# Altium PCB DB36.PcbDoc (part 2 of 6)
Units mm, origin at the board's own origin, x right, y up, seen from the top; angles counter-clockwise.
Board outline 82.2 x 113.2 mm, 8 copper layers (Top Layer, MidLayer1, MidLayer2, GND, MidLayer3, VCC, MidLayer4, Bottom Layer), stack 1.57 mm thick; 185 components, 477 nets, 1727 pads, 1538 vias.
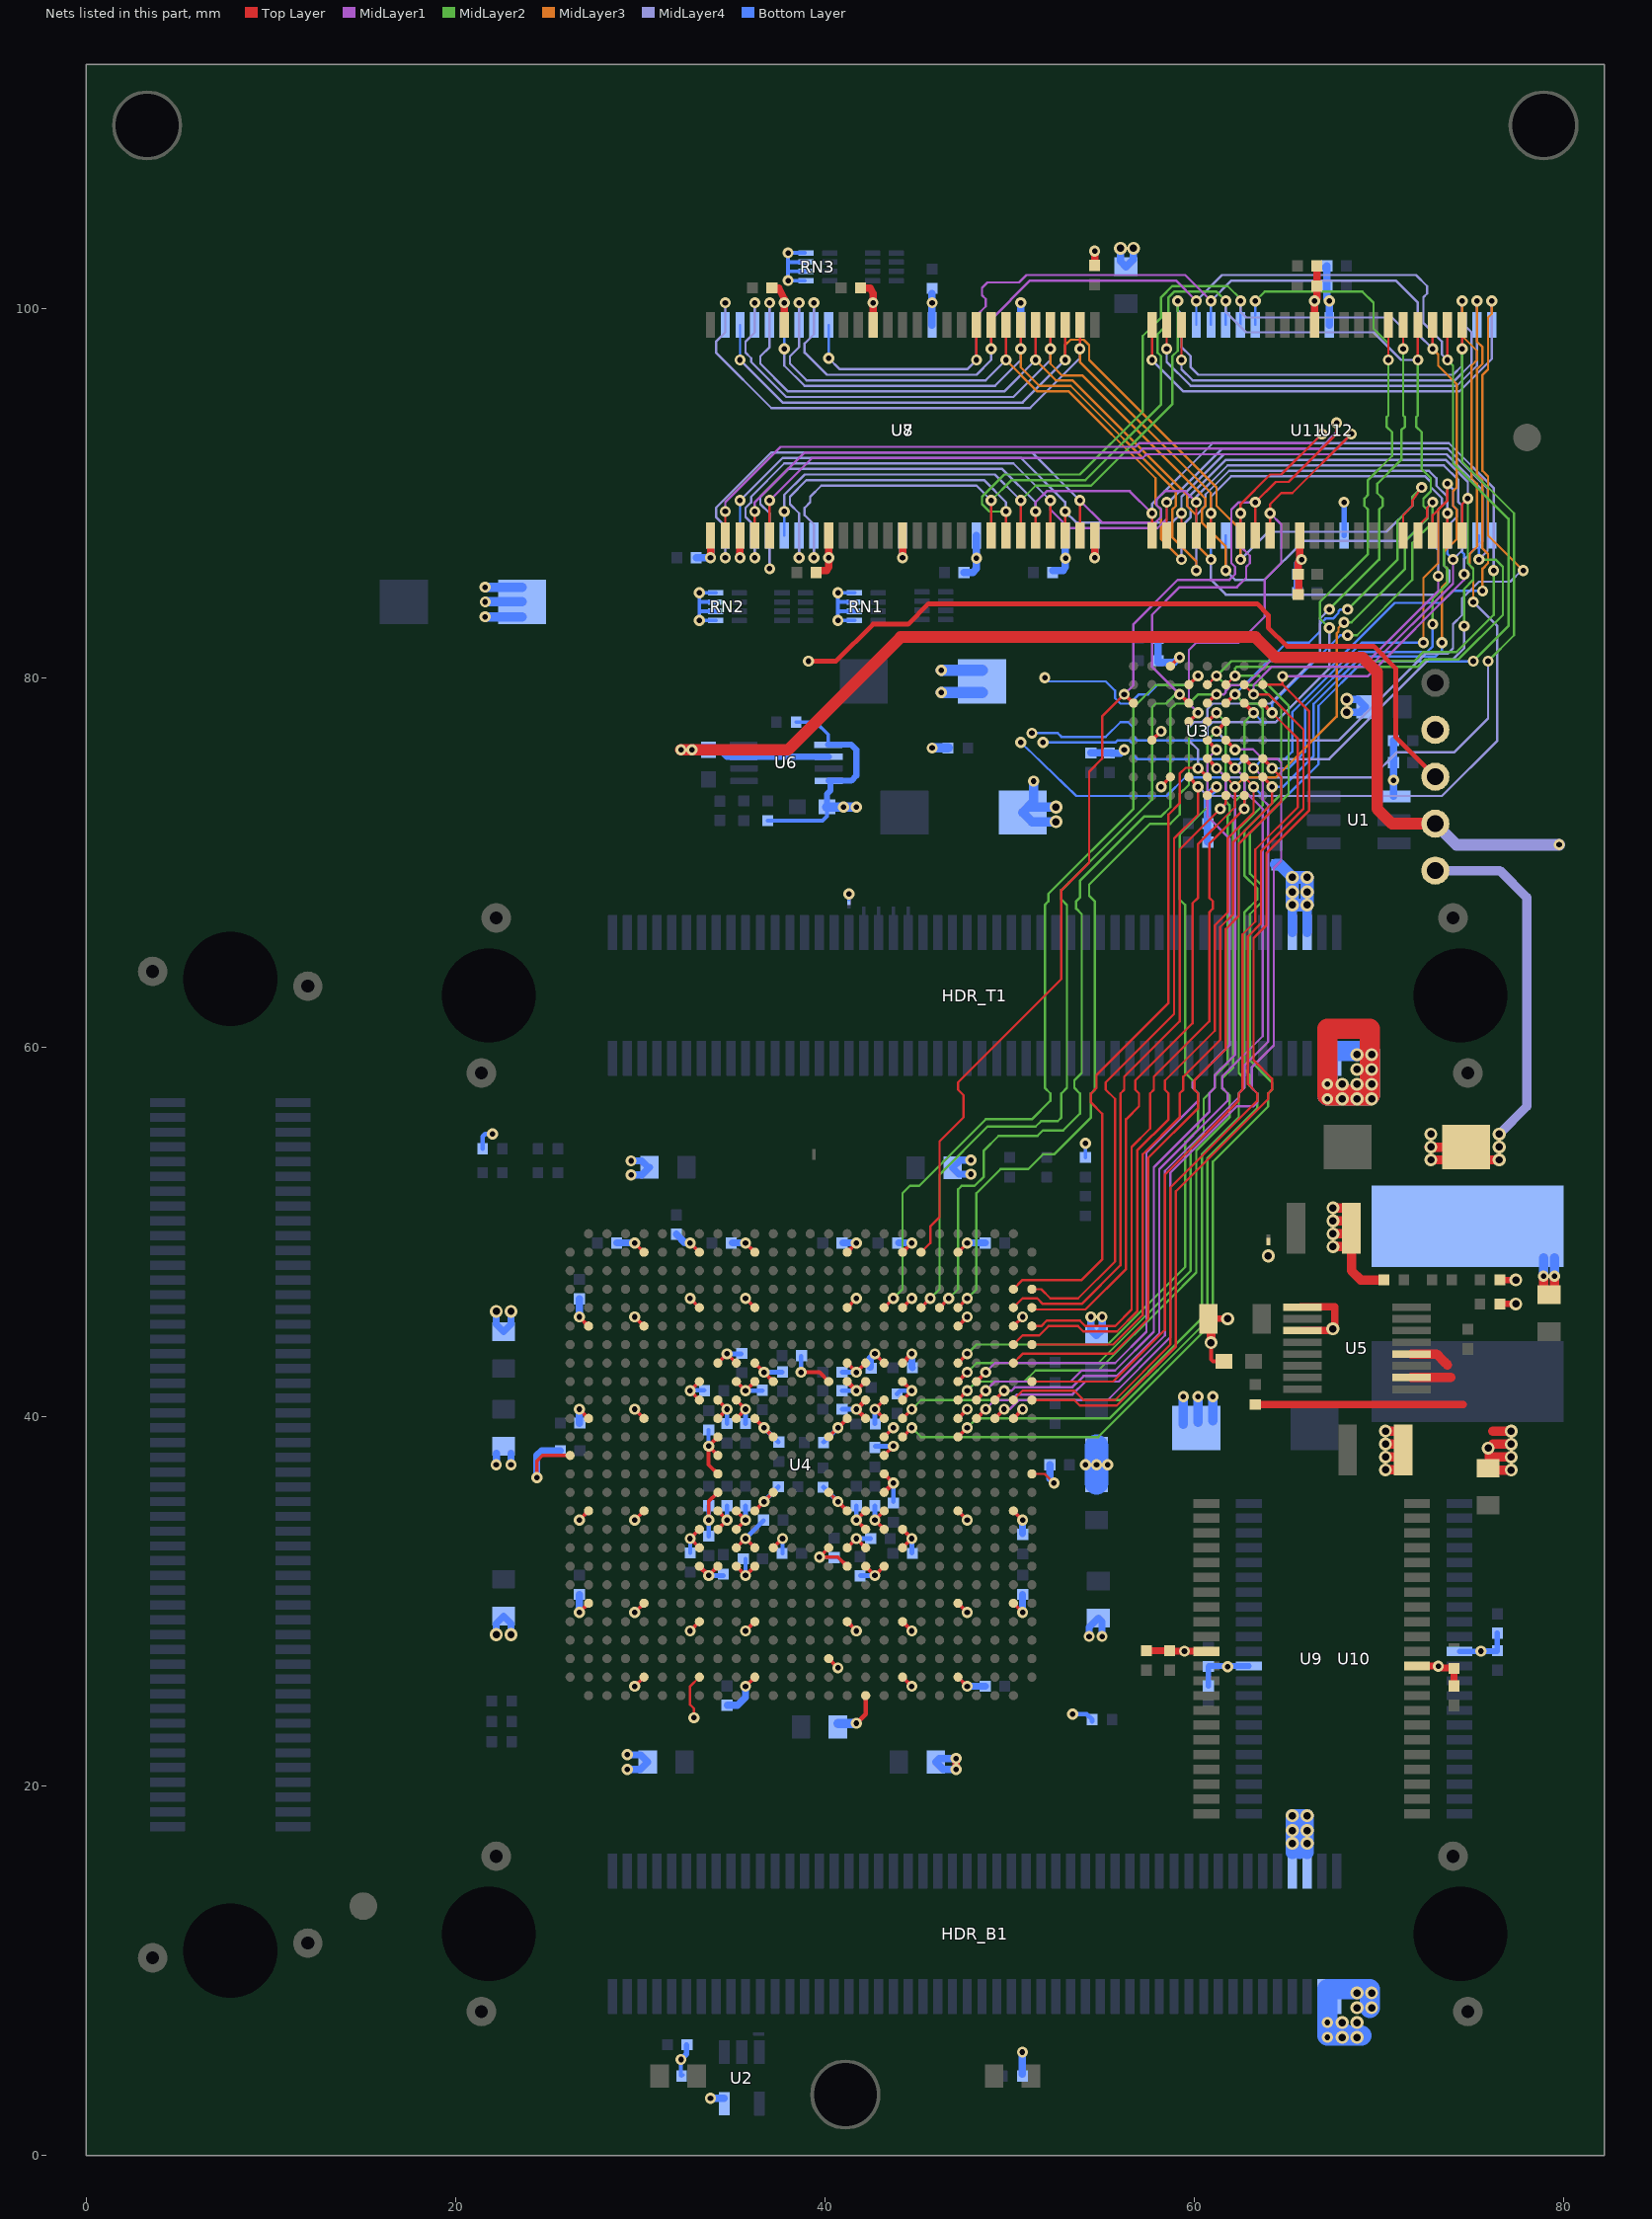
[diagram p8: the nets of this part, all layers, seen from the top]

## Part data
"Altium Logo Bot1" "Altium Logo Top1": library part D-000-0003, "Altium Logo for PCB"
C1 C7 C8 C9 C10 C11 C12 C13 C14 C25 C26 C27 C40 C41 C42 C43 C44 C71 C72 C73 C77 C91 C92 C93 C94 C99 C100 C103 C104 C107 C108 C109 C110: library part D-101-0080, "Capacitor, Ceramic, 0.1uF 10% 16V 0402 (1005) X7R"
C2 C15 C16 C17 C18 C19 C20 C21 C22 C28 C29 C30 C31 C45 C46 C47 C48 C49 C50 C51 C52 C53 C54 C55 C56 C57 C58 C59 C60 C61 C62 C63 C64 C65 C66 C67 C68 C74 C75 C76 C95 C96 C97 C98 C101 C102 C105 C106 C111 C112 C113 C114: library part D-101-0077, "Capacitor, Ceramic, 10nF 10% 16V 0402 (1005) X7R"
C3 C23 C69 C70 C82: library part D-101-0088, "Capacitor, Tantalum, 220uF 10% 10V MCCT-D (7343-31)"
C4 C5 C6 C24 C32 C33 C34 C35 C36 C37 C38 C39 C78 C79 C83 C85: library part D-101-0087, "Capacitor, Ceramic, 10uF 10% 10V 0805 (2012) X5R"
C80: library part D-101-0069, "Capacitor, Ceramic, 470pF 5% 50V 0402 (1005) COG"
C81 C88 C89: library part D-101-0095, "Capacitor, Ceramic, 2.2uF 10% 10V 0603 (1608) X5R"
C84 C86: library part D-101-0021, "Capacitor, Ceramic, 22uF -20%/+80% 10V 1210 (3225) Y5V"
C87: library part D-101-0027, "Capacitor, Ceramic, 1uF 10% 25V 1206 (3216) X7R"
C90: library part D-101-0105, "Capacitor, Ceramic, 0.033uF 10% 10V 0402 (1005) X7R"
FD1 FD2: library part D-000-0005, "Fiducial - Round 1.5mm Top-Bottom"
HDR_B1 HDR_L1 HDR_T1: library part D-300-0025, "Connector, Molex Docking Station 100 Pin Male 54075"
L1: library part D-102-0004, "Inductor, 2.2uH, 15A, 4R2, SMD"
LED1: library part D-153-0004, "LED, Green 0805 (2012) KP-2012SGD"
LED2: library part D-153-0003, "LED, Red 0805 (2013) HSMH-C170"
MH1 MH2 MH3: library part D-001-0001, "Mounting Hole, M3 Screw, Plated, Square Pad"
NT1 NT2 NT3 NT4 NT5 NT6 NT7 NT8: library part D-002-0002, "Net-Tie, Surface Mount, 2 x 0.4mm x 0.2mm SMT Pads - For 0.2mm Track"
PCB1: library part D-810-0010, "DB36 Blank PCB - Daughter Board Xilinx Virtex4 XC4VLX25FF668"
R1 R2: library part D-100-0111, "Resistor, 270R 1% 0402 (1005)"
R3 R5 R9 R12: library part D-100-0088, "Resistor, 4K7 1% 0402 (1005)"
R4 R6 R7 R8 R10 R11 R13 R14 R15 R16 R17: library part D-100-0131, "Resistor, 100R 1% 0402 (1005)"
R22 R27 R28 R29: library part D-100-0132, "Resistor, 100K 1% 0402 (1005)"
R23: library part D-100-0128, "Resistor, 10R 1% 0402 (1005)"
R24 R26: library part D-100-0105, "Resistor, 2K7 1% 0402 (1005)"
R25: library part D-100-0109, "Resistor, 27K 1% 0402 (1005)"
RN1 RN2 RN3 RN4 RN5 RN6: library part D-104-0001, "Resistor Network, Isolated, 4 x 100R, 5%, SMD 0402 x 4"
TP1 TP2 TP3 TP4 TP5: library part D-006-0000, "Test Point, PCB Mount with Silkscreen Box"
U1: library part D-263-0002, "Dual Addressable Switch Plus 1KB Memory"
U2: library part D-205-0001, "SN74LVC1G04DBV, Single Inverter Gate, 1.65-V to 5.5-V"
U3: library part D-262-0001, "S29GL256N11FFIV10, 256 Megabit (16M x 16) 3.0V Page Mode Flash Memory"
U4: library part D-241-0007, "FPGA, Xilinx Virtex-4, XC4VLX25"
U5: library part D-204-0002, "MAX1831EEE, 3A, 1MHz, Low-Voltage, Step-Down Regulators with Synchronous Rectification and Internal Switches"
U6: library part D-204-0016, "MAX8860EUA18+, 1.8V Linear Regulator with adjustable Output, Low-noise, Low-dropout, 300mA, uMAX"
U7 U8: library part D-261-0000, "MT48LC16M16A2TG, 256 Mbit High-Speed CMOS SDRAM, 16Mb x 16Bit x 4 Banks, TSOP54"
U9 U10 U11 U12: library part D-260-0000, "K6R4016V1D-TC10T, 256K x 16-Bit SRAM, TSOP44"

## Via types
v1: diameter 0.6, hole 0.3, Top Layer to Bottom Layer, 904 vias
v2: diameter 0.6, hole 0.3, Top Layer to Bottom Layer, tented both sides, 506 vias
v3: diameter 0.7, hole 0.4, Top Layer to Bottom Layer, 127 vias
v4: diameter 0.6, hole 0.3, Top Layer to Bottom Layer, tented top, 1 vias

## Nets (pads, with @x,y where several pads share a name; then routed paths per layer and width w, separated by ;. In a path a pad name is that pad's centre, name@x,y a point inside that pad or via, vN(x,y) a via of type N, cw(c..) or ccw(c..) an arc to the next point about the centre after c; other vN are vias at no path point)
1V2: C3.1 C4.1 C5.1 C6.1 C7.1 C8.1 C9.1 C10.1 C11.1 C12.1 C13.1 C14.1 C15.1 C16.1 C17.1 C18.1 C19.1 C20.1 C21.1 C22.1 C82.1 C85.1 C86.1 L1.2 R24.1 TP5.1 U4.J10 U4.J11 U4.J16 U4.J17 U4.K9 U4.K10 U4.K17 U4.K18 U4.L9 U4.L10 U4.L11 U4.L16 U4.L17 U4.L18 U4.M12 U4.M15 U4.R12 U4.R15 U4.T9 U4.T10 U4.T11 U4.T16 U4.T17 U4.T18 U4.U9 U4.U10 U4.U17 U4.U18 U4.V10 U4.V11 U4.V16 U4.V17 | length 82.6
  Top Layer w0.2: U4.U9@34.2,33.9 v1(34.7,34.4) U4.T9@34.2,34.9 ; U4.L9@34.2,39.9 v1(34.7,40.4) U4.K9@34.2,40.9 ; U4.V10@35.2,32.9 v1(35.7,33.4) U4.V11@36.2,32.9 ; U4.U10@35.2,33.9 v1(35.7,34.4) U4.T10@35.2,34.9 ; U4.L10@35.2,39.9 v1(35.7,40.4) U4.K10@35.2,40.9 ; U4.J10@35.2,41.9 v1(35.7,41.4) U4.J11@36.2,41.9 ; U4.T11@36.2,34.9 v1(36.7,35.4) U4.R12@37.2,35.9 ; U4.L11@36.2,39.9 U4.M12@37.2,38.9 ; U4.R15@40.2,35.9 v1(40.7,35.4) U4.T16@41.2,34.9 ; U4.M15@40.2,38.9 U4.L16@41.2,39.9 ; U4.V16@41.2,32.9 v1(41.7,33.4) U4.V17@42.2,32.9 ; v1(41.7,41.4) U4.J17@42.2,41.9 ; U4.U17@42.2,33.9 v1(41.7,34.4) U4.T17@42.2,34.9 ; U4.U18@43.2,33.9 v1(42.7,34.4) U4.T18@43.2,34.9 ; U4.L18@43.2,39.9 v1(42.7,40.4) U4.K18@43.2,40.9
  Top Layer w0.254: U4.J16@41.2,41.9 v1(41.7,41.4) ; U4.L17@42.2,39.9 v1(41.7,40.4) U4.K17@42.2,40.9
  Top Layer w0.5: C86.1@68.4,50.2 C86.1@68.45,50.15 ; C86.1@68.5,49.5 68.5,50.2 68.5,47.9 69,47.4 R24.1@70.262,47.4 ; v3(72.8,53.9) C82.1@74,53.9 ; C82.1@74.709,53.9 v3(76.5,53.9) ; C82.1@74.709,54.6 C82.1@74.702,54.593 C82.1@75.395,53.9 ; C85.1@78.9,46.6 v1(78.9,47.6) ; C85.1@79.5,46.6 v1(79.5,47.6)
  Top Layer w0.508: v3(67.5,49.2) C86.1@68.5,49.2 ; v3(67.5,49.9) C86.1@68.5,49.9 ; v3(67.5,50.6) C86.1@68.5,50.6 ; v3(67.5,51.3) C86.1@68.5,51.3 ; v3@72.707,54.593 C82.1@74.702,54.593
  MidLayer4 w0.508: TP5.1@73.043,69.562 76.538,69.562 78,68.1 78,56.8 v3(76.5,55.3)
  Bottom Layer w0.2: v1(36.7,35.4) v1@36.7,35.425 ; v1@40.6,35.4 v1(40.7,35.4)
  Bottom Layer w0.254: v1(34.7,34.4) C19.1@34.7,35.175 ; C22.1@34.7,39.625 v1(34.7,40.4) ; v1(35.7,33.4) C11.1@36.675,34.375 ; v1(35.7,34.4) C20.1@35.7,35.175 ; C14.1@35.7,39.625 v1(35.7,40.4) ; v1(35.7,41.4) C18.1@36.6,41.4 ; v1@36.7,35.425 C9.1@37.475,36.2 ; v1(36.7,39.4) C13.1@37.475,38.625 ; C15.1@39.925,36.175 v1(40.7,35.4) ; C10.1@39.925,38.625 v1(40.7,39.4) ; C21.1@40.925,40.4 v1(41.7,40.4) ; C12.1@40.925,41.4 v1(41.7,41.4) ; v1(41.7,33.4) C7.1@42.475,33.4 ; v1(41.7,34.4) C8.1@41.7,35.175 ; v1(42.7,34.4) C16.1@42.7,35.175 ; C17.1@42.7,39.625 v1(42.7,40.4)
  Bottom Layer w0.4: v1(22.2,37.4) C4.1@22.2,38 ; v1(23,37.4) C4.1@23,38
  Bottom Layer w0.5: v1(78.9,47.6) L1.2@78.9,48.6 ; v1(79.5,47.6) L1.2@79.5,48.6
  Bottom Layer w0.508: C3.1@59.4,39.586 v1(59.4,41.086) ; C3.1@60.2,39.686 v1(60.2,41.086) ; C3.1@61,39.786 v1(61,41.086)
  Bottom Layer w1.27: C6.1@54.7,38.4 54.701,38.399 C5.1@54.701,36.4
  other v1: 54.1,37.4 54.701,37.4 55.3,37.4
  other v3: 72.8,54.6 76.5,54.6 72.8,55.3
2V5: C23.1 C24.1 C25.1 C26.1 C27.1 C28.1 C29.1 C30.1 C31.1 C88.1 R22.2 R28.1 TP3.1 U4.AF17 U4.H11 U4.H16 U4.H17 U4.J12 U4.M9 U4.N9 U4.N18 U4.P9 U4.P18 U4.R18 U4.V15 U4.W10 U4.W11 U4.W16 U6.1 U6.4 | length 81.1
  Top Layer w0.2: 33.7,37.4 U4.P9@34.2,36.9 ; v1(33.7,38.4) U4.N9@34.2,37.9 ; U4.H11@36.2,42.9 v1(36.7,42.4) U4.J12@37.2,41.9 ; U4.H16@41.2,42.9 v1(41.7,42.4) U4.H17@42.2,42.9 ; U4.N18@43.2,37.9 v1(43.7,38.4)
  Top Layer w0.203: 33.7,37.4 v1(33.7,38.4) U4.M9@34.2,38.9 ; U4.W10@35.2,31.9 v1(35.7,31.4) U4.W11@36.2,31.9 ; U4.V15@40.2,32.9 v1(39.7,32.4) 40.7,32.4 U4.W16@41.2,31.9 ; U4.P18@43.2,36.9 v1(43.7,36.4)
  Top Layer w0.254: v2(39.1,80.9) 40.6,80.9 42.6,82.9 44.5,82.9 45.6,84 63.4,84 64,83.4 64,82.7 65,81.7 69.7,81.7 70.9,80.5 70.9,77.331 70.9,76.785 TP3.1@73.043,74.642 ; v1(41.7,23.4) 42.2,23.9 U4.AF17@42.2,24.9 ; U4.R18@43.2,35.9 v1(43.7,36.4)
  Bottom Layer w0.2: v1(43.7,38.4) v1@43.7,38.6
  Bottom Layer w0.203: v1(33.7,38.4) C29.1@33.7,39.275 ; v1(35.7,31.4) C31.1@35.7,32.3 ; R22.2@36.9,72.262 39.862,72.262 40.1,72.5 C88.1@40.1,73 ; R28.1@38.438,77.6 39.5,77.6 40.175,76.925 U6.1@40.175,76.375 ; v1(39.7,32.4) C27.1@40.475,32.4
  Bottom Layer w0.254: v1(36.7,42.4) C28.1@37.675,42.4 ; C25.1@40.925,42.4 v1(41.7,42.4) ; C26.1@42.725,38.4 v1(43.7,38.4) ; C30.1@43.7,35.4 v1@43.7,36.175
  Bottom Layer w0.33: C88.1@40.1,73 40.1,73.7 40.3,73.9 U6.4@40.3,74.425 ; U6.1@40.175,76.375 41.425,76.375 41.7,76.1 41.7,74.7 41.425,74.425 U6.4@40.2,74.425
  Bottom Layer w0.508: C88.1@40.1,73 v2(41.7,73) ; C24.1@40.7,23.4 v1(41.7,23.4)
  Bottom Layer w0.635: v2(46.3,79.2) C23.1@48.5,79.2 ; v2(46.3,80.4) C23.1@48.5,80.4
  other v2: 41,73
3V3: C1.2 C2.1 C32.1 C33.1 C34.1 C35.1 C36.1 C37.1 C38.1 C39.1 C40.1 C41.1 C42.1 C43.1 C44.1 C45.1 C46.1 C47.1 C48.1 C49.1 C50.1 C51.1 C52.1 C53.1 C54.1 C55.1 C56.1 C57.1 C58.1 C59.1 C60.1 C61.1 C62.1 C63.1 C64.1 C65.1 C66.1 C67.1 C68.1 C69.1 C70.1 C71.2 C72.1 C73.1 C74.1 C75.1 C76.1 C77.1 C78.1 C79.1 C91.1 C92.1 C93.1 C94.1 C95.1 C96.1 C97.1 C98.1 C99.1 C100.1 C101.1 C102.1 C103.1 C104.1 C105.1 C106.1 C107.1 C108.1 C109.1 C110.1 C111.1 C112.1 C113.1 C114.1 HDR_B1.94 HDR_B1.96 HDR_T1.94 HDR_T1.96 NT1.2 R1.1 R2.1 R3.2 R5.2 R9.2 R12.2 RN1.1 RN1.2 RN1.3 RN1.4 RN2.1 RN2.2 RN2.3 RN2.4 RN3.1 RN3.2 RN3.3 RN3.4 TP2.1 U1.4 U2.5 U3.D8 U3.F1 U3.F7 U3.G5 U4.AA2 U4.AA5 U4.AA22 U4.AA25 U4.AB8 U4.AB11 U4.AB16 U4.AB19 U4.AD15 U4.AE5 U4.AE8 U4.AE11 U4.AE19 U4.AE22 U4.B5 U4.B8 U4.B11 U4.B16 U4.B19 U4.B22 U4.E8 U4.E11 U4.E16 U4.E19 U4.F2 U4.F5 U4.F22 U4.F25 U4.H9 U4.H10 U4.H18 U4.H19 U4.J8 U4.J15 U4.J19 U4.K8 U4.K19 U4.L2 U4.L5 U4.L22 U4.L25 U4.M18 U4.N1 U4.P26 U4.R9 U4.T2 U4.T5 U4.T22 U4.T25 U4.U8 U4.U19 U4.V8 U4.V12 U4.V19 U4.W8 U4.W9 U4.W17 U4.W18 U7.1 U7.3 U7.9 U7.14 U7.27 U7.43 U7.49 U8.1 U8.3 U8.9 U8.14 U8.27 U8.43 U8.49 U9.11 U9.33 U10.11 U10.33 U11.11 U11.33 U12.11 U12.33 | length 216.2
  Top Layer w0.127: v1(32.9,23.7) 32.9,24.2 32.7,24.4 32.7,25.4 U4.AE8@33.2,25.9 ; U7.9@40.2,87.2 U7.9@40.2,87.7 ; U4.P26@51.2,36.9 51.9,36.9 v1(52.4,36.4)
  Top Layer w0.178: v1(29.7,49.4) U4.B5@30.2,48.9 ; U4.B22@47.2,48.9 v1(47.7,49.4) ; U4.AA25@50.2,29.9 v1(50.7,29.4) ; U4.F25@50.2,44.9 v1(50.7,45.4)
  Top Layer w0.2: v1(24.4,36.7) 24.4,37.6 24.7,37.9 U4.N1@26.2,37.9 ; v1(26.7,29.4) U4.AA2@27.2,29.9 ; v1(26.7,34.4) U4.T2@27.2,34.9 ; v1(26.7,40.4) U4.L2@27.2,39.9 ; v1(26.7,45.4) U4.F2@27.2,44.9 ; v1(29.7,25.4) U4.AE5@30.2,25.9 ; v1(29.7,29.4) U4.AA5@30.2,29.9 ; v1(29.7,34.4) U4.T5@30.2,34.9 ; v1(29.7,40.4) U4.L5@30.2,39.9 ; v1(29.7,45.4) U4.F5@30.2,44.9 ; v1(32.7,28.4) U4.AB8@33.2,28.9 ; v1(32.7,46.4) U4.E8@33.2,45.9 ; v1(32.7,49.4) U4.B8@33.2,48.9 ; U4.V8@33.2,32.9 v1(32.7,33.4) U4.U8@33.2,33.9 ; U4.K8@33.2,40.9 v1(32.7,41.4) U4.J8@33.2,41.9 ; v1(33.7,34.4) 33.7,35.4 U4.R9@34.2,35.9 ; U4.H9@34.2,42.9 v1(34.7,43.4) U4.H10@35.2,42.9 ; v1(35.7,25.4) U4.AE11@36.2,25.9 ; v1(35.7,28.4) U4.AB11@36.2,28.9 ; v1(35.7,46.4) U4.E11@36.2,45.9 ; v1(35.7,49.4) U4.B11@36.2,48.9 ; U4.V12@37.2,32.9 v1(37.7,33.4) ; v1(38.7,42.4) 39.7,42.4 U4.J15@40.2,41.9 ; U4.AD15@40.2,26.9 v1(40.7,26.4) ; U4.AB16@41.2,28.9 v1(41.7,28.4) ; U4.E16@41.2,45.9 v1(41.7,46.4) ; U4.B16@41.2,48.9 v1(41.7,49.4) ; U4.W17@42.2,31.9 v1(42.7,31.4) U4.W18@43.2,31.9 ; v1(42.7,43.4) U4.H18@43.2,42.9 ; U4.M18@43.2,38.9 v1(43.7,39.4) ; U4.AE19@44.2,25.9 v1(44.7,25.4) ; U4.AB19@44.2,28.9 v1(44.7,28.4) ; U4.V19@44.2,32.9 v1(44.7,33.4) U4.U19@44.2,33.9 ; U4.K19@44.2,40.9 v1(44.7,41.4) U4.J19@44.2,41.9 ; U4.E19@44.2,45.9 v1(44.7,46.4) ; U4.B19@44.2,48.9 v1(44.7,49.4) ; U4.AE22@47.2,25.9 v1(47.7,25.4) ; U4.AA22@47.2,29.9 v1(47.7,29.4) ; U4.T22@47.2,34.9 v1(47.7,34.4) ; U4.L22@47.2,39.9 v1(47.7,40.4) ; U4.F22@47.2,44.9 v1(47.7,45.4) ; U4.T25@50.2,34.9 v1(50.7,34.4) ; U4.L25@50.2,39.9 v1(50.7,40.4) ; U3.G5@57.7,76.625 v1(58.2,77.1) ; v1@58.2,74.125 U3.F7@58.7,74.625 ; U3.F1@58.7,80.625 v1@59.2,81.125 ; U3.D8@60.7,73.625 v1@61.2,74.125
  Top Layer w0.203: v1(33.7,31.4) U4.W9@34.2,31.9
  Top Layer w0.254: U4.W8@33.2,31.9 v1(33.7,31.4) ; U4.H19@44.2,42.9 v1(44.7,43.4)
  Top Layer w0.381: v1(47.1,20.9) v1(47.1,21.5) ; C102.1@57.4,27.325 C100.1@58.652,27.325 58.672,27.305 59.512,27.305 59.517,27.3 U9.33@60.652,27.3 ; U9.11@72.052,26.5 73.3,26.5 73.4,26.4 74.027,26.4 C99.1@74.052,26.375 C101.1@74.052,25.425 ; v1@73.195,26.5 v1(73.203,26.492)
  Top Layer w0.4: v2@33.8,86.6 U7.1@33.8,87.7 ; v2(35.4,86.5) U7.3@35.4,87.7 ; C95.1@37.125,101.1 37.5,101.1 37.8,100.5 v2@37.8,100.2 ; U7.49@37.8,99.1 v2(37.8,100.3) ; C92.1@39.525,85.8 40.1,85.8 40.2,86 40.2,86.1 40.22,86.399 40.223,86.445 40.225,86.475 v2@40.219,86.504 ; U7.9@40.2,87.7 v2@40.2,86.6 ; C96.1@41.925,101.1 42.45,101.1 42.6,100.8 v2@42.6,100.2 ; U7.43@42.6,99.1 v2(42.6,100.3) ; v2(44.2,86.5) U7.14@44.2,87.7 ; v2(54.6,86.5) U7.27@54.6,87.7 ; C91.1@54.6,102.325 v2(54.6,103.1) ; C111.1@65.593,85.625 C111.1@65.618,85.6 65.618,86.218 v2(65.8,86.4) 65.7,86.5 U11.11@65.7,87.7 ; C107.1@65.643,84.575 65.643,85.6 C111.1@65.642,85.604 ; U11.33@66.5,99.1 v2(66.5,100.4) 66.625,100.525 C108.1@66.625,102.3 ; v2@40.2,86.6 v2@40.219,86.504 ; v2@40.2,86.6 v2@40.219,86.504
  MidLayer4 w0.127: v3@65.3,16.8 v3(65.3,16.9)
  Bottom Layer w0.2: v1@21.996,55.3 v1@21.996,55.321 ; v1(32.2,5.2) 32.2,4.338 R1.1@32.238,4.3 R1.1@32.3,4.362 ; C71.2@32.5,5.975 C71.2@32.525,6 ; C40.1@32.7,32.625 v1(32.7,33.4) ; 33.2,83.6 RN2.2@34.1,83.6 ; 33.2,84.1 RN2.3@34.1,84.1 ; RN2.1@34.1,83.1 v1(33.2,83.1) v1(33.2,84.6) RN2.4@34.1,84.6 ; U2.5@34.525,3.1 U2.5@34.55,3.125 ; C67.1@37.7,32.6 v1(37.7,33.4) ; 38,102 RN3.2@38.9,102 ; 38,102.5 RN3.3@38.9,102.5 ; RN3.1@38.9,101.5 v1(38,101.5) v1(38,103) RN3.4@38.9,103 ; 40.7,83.6 RN1.2@41.6,83.6 ; 40.7,84.1 RN1.3@41.6,84.1 ; NT1.2@41.3,68 v2(41.3,68.3) ; RN1.1@41.6,83.1 v1(40.7,83.1) v1(40.7,84.6) RN1.4@41.6,84.6 ; v1(47.1,21.5) v1@47.1,21.7 ; R5.2@54.1,54.038 v1(54.1,54.8) v1@54.1,54.9
  Bottom Layer w0.25: R3.2@21.462,54.5 21.462,55.162 21.6,55.3 v1@21.996,55.3 ; R12.2@54.462,23.5 R12.2@54.462,23.538
  Bottom Layer w0.254: v1@32.7,41.425 C53.1@33.45,41.425 ; v1(33.7,31.4) C56.1@34.5,31.4 ; C59.1@33.7,33.525 v1(33.7,34.4) C66.1@33.7,35.175 ; v1(34.7,43.4) C63.1@35.475,43.4 ; v1(38.7,42.4) C61.1@38.7,43.275 ; C58.1@41.925,31.4 v1(42.7,31.4) ; C52.1@43.9,41.225 44.075,41.4 v1(44.7,41.4) ; C65.1@44.7,32.625 v1(44.7,33.4) ; 52.176,36.624 v1(52.4,36.4) ; v1(53.4,23.9) 54.162,23.9 R12.2@54.462,23.6
  Bottom Layer w0.3: v1(32.2,5.2) 32.5,5.5 C71.2@32.5,5.975 ; C103.1@60.752,25.425 C105.1@60.752,26.475 60.777,26.5 U10.11@62.952,26.5 ; v1(61.798,26.467) v1@61.831,26.5 ; U12.11@68.1,87.7 v2(68.1,89.5) ; U10.33@74.352,27.3 75.509,27.3 v1(75.514,27.305) 76.38,27.305 C106.1@76.4,27.325 C104.1@76.4,28.275
  Bottom Layer w0.381: v3(22.2,28.2) 22.2,28.8 C35.1@22.6,29.2 23,28.8 v3(23,28.2) ; v3(22.2,45.7) 22.2,45 C33.1@22.6,44.6 23,45 v3(23,45.7) ; v1(24.4,36.7) 24.4,37.9 24.65,38.15 C55.1@25.674,38.15 ; v1(26.7,29.4) C57.1@26.699,30.375 ; v1(26.7,45.4) C44.1@26.699,46.375 ; C68.1@28.724,49.4 v1(29.7,49.4) ; v2(29.3,20.9) 30,20.9 C39.1@30.4,21.3 30,21.7 v2(29.3,21.7) ; v1(29.503,53.086) 30.086,53.086 C32.1@30.5,53.5 ; v1(29.503,53.848) 30.074,53.848 C32.1@30.404,53.518 ; C54.1@31.95,49.875 32.425,49.4 v1(32.7,49.4) ; C49.1@34.7,24.374 35.274,24.374 35.7,24.8 v1(35.7,25.4) ; C47.1@34.975,49.4 v1(35.7,49.4) ; C51.1@40.976,49.4 v1(41.7,49.4) ; C43.1@43.975,49.4 v1(44.7,49.4) ; v1(44.7,43.4) 44.7,42.675 C41.1@44.725,42.65 ; C38.1@46,21.3 46.4,20.9 v1(47.1,20.9) ; v1(47.7,49.4) C48.1@48.675,49.4 ; v1@47.701,25.399 C45.1@48.675,25.399 ; v1(47.9,53.127) 47.251,53.127 C34.1@46.903,53.474 47.317,53.889 v1(47.9,53.889) ; v1(50.7,29.4) C62.1@50.701,30.375 ; C64.1@50.701,33.675 v1(50.7,34.4) ; 52.176,36.624 C60.1@52.176,37.4 ; v1(54.3,28.1) 54.3,28.6 C37.1@54.8,29.1 55,28.9 v1(55,28.1)
  Bottom Layer w0.4: C42.1@26.7,39.65 v1(26.7,40.4) ; v1(32.7,41.4) v1@32.7,41.425 ; C93.1@33.025,86.5 v2(33.8,86.5) ; U8.27@33.775,87.325 U8.27@33.8,87.3 ; v1(33.8,3.1) U2.5@34.525,3.1 ; v2@33.8,86.475 U8.27@33.8,87.7 ; C50.1@42.45,42.675 42.45,43.15 v1(42.7,43.4) ; v2(44.2,86.5) U8.14@44.2,87.7 ; U8.43@45.8,99.1 C94.1@45.8,100.8 ; C38.1@46,21.3 46.2,21.5 v1(47.1,21.5) ; C98.1@47.525,85.7 48,85.7 48.2,85.9 v2(48.2,86.475) U8.9@48.2,87.7 ; U8.49@50.6,99.1 v2(50.6,100.3) ; R2.1@50.688,4.4 v1(50.688,5.6) ; C97.1@52.325,85.8 52.9,85.8 53,86 53,86.1 U8.3@53,87.7 ; v2@53,86.6 v2(53.025,86.475) ; v4(54.4,45.4) 54.4,44.7 C36.1@54.7,44.4 55,44.7 v1(55,45.4) ; C77.1@54.4,75.95 55.5,75.95 55.525,75.925 56,75.925 v1(56.2,76.1) ; v2(54.6,86.5) 54.6,86.6 U8.1@54.6,87.7 ; v3(56,103.25) 56,102.55 C79.1@56.3,102.25 56.7,102.65 v3(56.7,103.25) ; C73.1@58.025,81.925 58.025,80.825 58.9,80.825 v1@59.187,81.112 ; C72.1@60.725,71.1 60.7,71.125 60.7,73.6 v1@61.2,74.1 ; C109.1@65.575,84.6 C113.1@65.575,85.6 65.6,85.625 65.6,86.2 v2(65.8,86.4) ; C110.1@67.1,102.225 C110.1@67.175,102.3 67.175,100.525 v2(67.3,100.4) v2@67.3,100.5 ; U12.33@67.307,99.1 v2@67.307,100.2 ; v3(68.25,78.125) 68.95,78.125 C78.1@69.25,78.425 68.85,78.825 v3(68.25,78.825) ; U1.4@70.775,73.6 C1.2@70.775,76.6
  Bottom Layer w0.5: C70.1@50.995,73 v3(52.5,73) ; v1(51.3,74.4) 51.3,73.305 50.702,72.707 51.209,72.2 v3(52.5,72.2)
  Bottom Layer w0.508: v2(21.6,83.3) C69.1@23.6,83.3 ; v2(21.6,84.9) C69.1@23.6,84.9 ; v2(21.607,84.107) C69.1@23.602,84.107 ; v1(45.8,76.2) R9.2@46.662,76.2 ; HDR_T1.94@65.3,66.2 v3(65.3,68.4) ; HDR_T1.96@66.1,66.2 v3(66.1,68.4)
  Bottom Layer w0.635: C46.1@64.4,69.9 64.6,69.9 v3(65.3,69.2)
  Bottom Layer w0.7: 65.3,16.4 v3(65.3,18.4) v3(66.1,18.4) 66.1,16.4 ; 65.7,16.4 65.7,18.4 ; v3(65.3,67.7) v3(66.1,67.7) v3(66.1,69.2) v3(65.3,69.2) v3(65.3,67.7)
  other v1: 59.461,27.305 22,55.3 58.2,74.1 61.2,74.1 59.2,81.1
  other v2: 70.775,74.45 40.2,86.5 45.8,100.3
  other v3: 66.1,16.9 65.3,17.6 66.1,17.6
5V0: C83.1 C84.1 C89.1 HDR_B1.97 HDR_B1.99 HDR_T1.97 HDR_T1.99 R23.1 TP4.1 U5.2 U5.4 U6.2 U6.7 | length 121.6
  Top Layer w0.4: R23.1@63.262,40.7 R23.1@63.3,40.662 74.562,40.662 ; C83.1@75.9,37.2 v3(75.9,38.3)
  Top Layer w0.508: v3(70.35,38.519) C84.1@71.35,38.519 ; v3(70.35,39.219) C84.1@71.35,39.219 ; v3(70.35,37.119) C84.1@71.35,37.119 ; v3(70.35,37.819) C84.1@71.35,37.819 ; U5.2@71.744,42.132 73.868,42.132 ; U5.4@71.744,43.389 73.11,43.389 73.4,43.1 73.55,42.95 73.7,42.8 ; C83.1@76.15,37.112 v3(77.15,37.112) ; 76.15,37.812 v3(77.15,37.812) ; v3@76.15,38.512 v3(77.15,38.512) ; 76.15,39.212 v3(77.15,39.212)
  Top Layer w0.635: v2(32.2,76.1) 38,76.1 44.1,82.2 63.3,82.2 64.4,81.1 69.1,81.1 69.9,80.3 69.9,73.8 69.9,72.9 70.698,72.102 TP4.1@73.043,72.102
  Top Layer w1.1: v1@67.2,57.4 67.2,61 69.5,61 69.5,57.4 v1@67.2,57.4
  MidLayer4 w0.635: TP4.1@73.043,72.102 74.182,70.963 v1(79.746,70.963)
  Bottom Layer w0.33: C89.1@33.7,76.1 34.3,76.1 34.675,75.725 U6.2@40.2,75.725
  Bottom Layer w0.508: v2(32.2,76.1) C89.1@33.7,76.1
  Bottom Layer w1.1: 67.3,6.7 v3@68,6.7 ; v3@69,6.5 69.05,6.5 68.8,6.5 68,6.5 67.2,6.5 67.2,9 69.5,9 69.5,8.8 v3@69.5,8 ; v1@67.2,57.4 67.2,59.8 69.5,59.8 69.5,59.6 69.5,58.8 69.5,58 69.5,57.4 v1@67.2,57.4
  other v1: 67.2,6.4 67.2,7.2 67.2,57.2 67.2,58
  other v2: 32.8,76.1
  other v3: 68,6.4 68.8,6.4 68,7.2 68.8,7.2 68.8,8 69.6,8 68.8,8.8 69.6,8.8 68,57.2 68.8,57.2 69.6,57.2 68,58 68.8,58 69.6,58 68.8,58.8 69.6,58.8 68.8,59.6 69.6,59.6
AGND: C81.2 C87.1 NT8.1 R26.2 R27.2 U5.9 U5.11 | length 11
  Top Layer w0.2: v3(60.9,44) 60.9,43.1 61,43 C81.2@61.6,43
  Top Layer w0.35: C87.1@60.75,45.3 v3(61.8,45.3) ; R27.2@76.538,46.1 v3(77.4,46.1) ; R26.2@76.538,47.4 v3(77.4,47.4)
  Top Layer w0.4: U5.9@65.765,45.94 65.813,45.941 65.851,45.941 67.598,45.945 67.598,45.943 ; U5.11@65.813,44.659 U5.11@65.852,44.659 67.403,44.659 v3(67.493,44.749) ; 67.5,45.943 67.598,45.943 ; v3@67.598,44.749 67.598,44.66 67.598,45.943
  Top Layer w0.5: v3(60.9,44) 60.9,45.15 C87.1@60.75,45.3 C87.1@60.9,45.45
  other v3: 64,48.7
BUS_A1: U3.E2 U4.E18 | length 54.7
  Top Layer w0.2: U4.E18@43.2,45.9 v1(43.7,46.4) ; U3.E2@59.7,79.625 v1(60.2,80.1)
  MidLayer2 w0.127: v1(43.7,46.4) 44.2,46.9 44.2,51.5 44.2,51.8 44.2,52.1 44.6,52.5 45.1,52.5 46.4,53.8 48.7,56.1 51.2,56.1 52.2,57.1 52.2,57.5 51.9,57.8 51.9,67.7 52.1,67.9 52.1,68.3 56.7,72.9 56.7,78.4 57.9,79.6 59.7,79.6 v1(60.2,80.1)
  Bottom Layer w0.127: v1(51.9,80) 52.1,79.8 55.2,79.8 55.7,79.3 55.7,78.9 56,78.6 56.5,78.6 57,79.1 57.5,79.1 58,79.6 59.7,79.6 v1(60.2,80.1)
BUS_A2: U3.D2 U4.M22 U7.23 U8.23 U11.1 U12.1 | length 136.3
  Top Layer w0.127: U7.23@51.4,87.7 v2(51.4,89) ; U11.1@57.7,87.7 v1(57.7,88.9) ; U3.D2@60.7,79.625 60.725,79.625 v1(61.2,80.1)
  Top Layer w0.2: U4.M22@47.2,38.9 v1(47.7,39.4)
  MidLayer1 w0.127: v2(51.4,89) 51.4,89.5 52,90.1 56.5,90.1 v1(57.7,88.9)
  MidLayer2 w0.127: v1(47.7,39.4) 48.2,39.9 52.8,39.9 53.1,39.9 55.4,39.9 60.7,45.2 60.7,54 63.4,56.7 63.4,57.5 63,57.9 63,58.5 62.7,58.8 62.7,67.3 63.4,68 63.4,68.6 62.7,69.3 62.7,71.7 64.7,73.7 64.7,78.4 63.5,79.6 61.7,79.6 v1(61.2,80.1) 62,80.9 71.9,80.9 72.4,81.4 74.2,81.4 76.2,83.4 v1(76.2,85.8)
  MidLayer4 w0.127: v2(37,85.9) 37,88.9 36.5,89.4 36.5,89.8 38,91.3 49.6,91.3 51.4,89.5 v2(51.4,89) ; v1(57.7,88.9) 57.7,89.4 61,92.7 73.778,92.7 76.2,90.278 v1(76.2,85.8)
  Bottom Layer w0.127: v2(37,85.9) U8.23@37,87.7 ; v1(76.2,85.8) U12.1@76.2,87.7
BUS_A3: U3.C2 U4.M19 U7.24 U8.24 U11.2 U12.2 | length 140.3
  Top Layer w0.127: U7.24@52.2,87.7 v2(52.2,89.6) ; U11.2@58.5,87.7 v1(58.5,89.5) ; U3.C2@61.7,79.625 61.725,79.625 v1(62.2,80.1)
  Top Layer w0.178: U4.M19@44.2,38.9 v1(44.7,39.4)
  MidLayer1 w0.127: v2(52.2,89.6) 52.2,89.1 53.2,88.1 58,88.1 58.5,88.6 v1(58.5,89.5)
  MidLayer2 w0.127: v1(44.7,39.4) 45.2,38.9 52.8,38.9 53.1,38.9 54.8,38.9 61,45.1 61,53.8 64,56.8 64,57.5 64.2,57.7 64.2,58.1 63,59.3 63,67.2 63.7,67.9 63.7,68.7 63,69.4 63,71.6 65.1,73.7 65.1,78.5 63.5,80.1 v1(62.2,80.1) 62.2,80.5 62.3,80.6 72.1,80.6 72.5,81 74.3,81 76.7,83.4 76.7,86 76.3,86.4 v1(75.4,86.4)
  MidLayer4 w0.127: v2(36.2,86.5) 36.2,88.2 35.7,88.7 35.7,89.2 36,89.5 36,89.8 37.8,91.6 50.2,91.6 v2(52.2,89.6) ; v1(58.5,89.5) 58.6,89.5 61.5,92.4 73.718,92.4 75.87,90.249 75.87,86.87 v1(75.4,86.4)
  Bottom Layer w0.127: v2(36.2,86.5) U8.24@36.2,87.7 ; v1(75.4,86.4) U12.2@75.4,87.7
BUS_A4: U3.A2 U4.K26 U7.25 U8.25 U11.3 U12.3 | length 120.7
  Top Layer w0.127: U4.K26@51.2,40.9 52.8,40.9 53.1,40.9 53.5,40.9 53.8,40.6 55.8,40.6 59,43.8 59,52.2 64,57.2 64,57.5 64.2,57.7 64.2,58.3 63.2,59.3 63.2,65.9 63.9,66.6 63.9,70.5 66.2,72.8 66.2,78.2 64.775,79.625 ; U7.25@53,87.7 v2(53,89) ; U11.3@59.3,87.7 v1(59.3,88.9) ; U3.A2@63.7,79.625 64.775,79.625 ; v1(64.775,80.075) 64.775,79.625
  MidLayer1 w0.127: v1(64.775,80.075) 69.375,80.075 74.6,85.3 v1(74.6,85.6)
  MidLayer4 w0.127: v2(35.4,89.6) 37.7,91.9 50.612,91.9 53,89.513 v2(53,89) 53.6,88.4 58.8,88.4 v1(59.3,88.9) 59.3,89.8 61.6,92.1 73.659,92.1 75.59,90.169 75.59,87.401 74.6,86.411 v1(74.6,85.6)
  Bottom Layer w0.127: U8.25@35.4,87.7 v2(35.4,89.6) ; U12.3@74.5,87.125 U12.3@74.6,87.225 ; U12.3@74.5,87.7 74.5,86.8 74.6,86.7 v1(74.6,85.6)
BUS_A5: U3.B2 U4.K25 U7.26 U8.26 U11.4 U12.4 | length 126.1
  Top Layer w0.127: U4.K25@50.2,40.9 50.7,41.4 52.8,41.4 53.1,41.4 53.5,41.4 54,40.9 55.7,40.9 58.7,43.9 58.7,52.4 63.4,57.1 63.4,57.5 62.9,58 62.9,66 63.6,66.7 63.6,70.6 65.9,72.9 65.9,77.2 64,79.1 v1(63.2,79.1) 62.7,79.6 U3.B2@62.7,79.625 ; U7.26@53.8,87.7 v2(53.8,89.6) ; U11.4@60.1,87.7 v1(60.1,89.5)
  MidLayer1 w0.127: v2(53.8,89.6) 55,88.4 57.9,88.4 58.2,88.7 58.2,89.1 57.954,89.346 57.954,89.654 58.4,90.1 59.5,90.1 v1(60.1,89.5) ; v1(63.2,79.1) 63.2,79.6 64.2,80.6 69.5,80.6 74,85.1 v1(74,86.4)
  MidLayer4 w0.127: v2(34.6,86.5) 34.6,88.2 34.1,88.7 34.1,89.2 37.1,92.2 51.2,92.2 v2(53.8,89.6) ; v1(60.1,89.5) 60.1,89.8 61.8,91.5 73.5,91.5 74.287,90.712 74.287,89.512 74.5,89.3 74.5,86.9 v1(74,86.4)
  Bottom Layer w0.127: v2(34.6,86.5) U8.26@34.6,87.7 ; U12.4@73.8,87.6 U12.4@73.7,87.7 73.7,86.7 v1(74,86.4)
BUS_A6: U3.D3 U4.E21 U7.29 U8.29 U11.5 U12.5 | length 121.7
  Top Layer w0.127: v2(53.8,97.8) U7.29@53.8,99.1 ; U11.5@60.9,87.7 v1(60.9,88.9)
  Top Layer w0.2: U4.E21@46.2,45.9 v1(46.7,46.4) ; U3.D3@60.7,78.625 v1(61.2,79.1)
  MidLayer1 w0.127: v1(61.2,79.1) 61.6,79.1 61.7,79.2 61.7,79.3 62,79.6 62.8,79.6 64.1,80.9 69.4,80.9 73.2,84.7 v1(73.2,85.5)
  MidLayer2 w0.127: v1(46.7,46.4) 47.2,46.9 47.2,51.5 47.2,51.8 47.2,52.3 47.4,52.5 48.1,52.5 48.6,53 48.6,54.4 49.4,55.2 51.5,55.2 51.8,55.5 52.9,55.5 53.8,56.4 53.8,57.5 53.5,57.8 53.5,58.2 53.9,58.6 53.9,67.2 53.6,67.5 53.6,67.9 53.8,68.1 53.8,69 57.3,72.5 58.2,72.5 58.7,73 58.7,78.3 59,78.6 59.7,78.6 60.2,79.1 v1(61.2,79.1)
  MidLayer3 w0.127: v2(53.8,97.8) 53.8,97.1 60.9,90 v1(60.9,88.9)
  MidLayer4 w0.127: v2(34.6,100.3) 34.6,98.7 34.1,98.2 34.1,97.6 37.1,94.6 51.1,94.6 53.8,97.3 v2(53.8,97.8) ; v1(60.9,88.9) 60.9,89.812 61.987,90.9 72.5,90.9 72.8,90.6 72.8,90.319 73.4,89.719 73.4,89.3 73.2,89.1 v1(73.2,85.5)
  Bottom Layer w0.127: U8.29@34.6,99.1 v2(34.6,100.3) ; U12.5@72.9,87.7 72.9,87.2 73.2,86.9 v1(73.2,85.5)
BUS_A7: U3.C3 U4.L19 U7.30 U8.30 U11.18 U12.18 | length 129.2
  Top Layer w0.127: v2(53,97.2) U7.30@53,99.1 ; U11.18@71.3,87.7 71.3,88.8 71.8,89.3 71.8,89.6 v1(72.3,90.3)
  Top Layer w0.178: U4.L19@44.2,39.9 v1(44.7,40.4)
  Top Layer w0.2: U3.C3@61.7,78.625 v1(62.2,79.1)
  MidLayer2 w0.127: v1(44.7,40.4) 45.2,40.9 52.8,40.9 53.1,40.9 55.975,40.9 59,43.925 60.4,45.325 60.4,54.2 62.4,56.2 62.4,57.5 62.7,57.8 62.7,58.3 62.4,58.6 62.4,71.8 63.7,73.1 63.7,78.3 63.4,78.6 62.7,78.6 v1(62.2,79.1) ; v1(68.3,83.7) 71,86.4 71,88.5 71.8,89.3 71.8,89.8 v1(72.3,90.3)
  MidLayer3 w0.127: v2(53,97.2) 53,98 53.3,98.3 54,98.3 54.3,98 54.3,97.2 61.2,90.3 61.2,89.3 62.5,88 v2(62.5,86.4)
  MidLayer4 w0.127: v2(35.4,97.2) 37.7,94.9 50.7,94.9 v2(53,97.2) ; v2(62.5,86.4) 64,87.9 70.4,87.9 71.8,89.3 71.8,89.8 v1(72.3,90.3)
  Bottom Layer w0.127: v2(35.4,97.2) U8.30@35.4,99.1 ; v1(62.2,79.1) 65,81.9 66.2,81.9 66.8,82.5 66.8,82.9 67.1,83.2 67.5,83.2 67.8,83.5 67.8,83.6 67.9,83.7 v1(68.3,83.7) ; v2(62.5,86.4) U12.18@62.5,88.2
BUS_A8: U3.A3 U4.J26 U7.31 U8.31 U11.19 U12.19 | length 120.3
  Top Layer w0.127: U4.J26@51.2,41.9 52.8,41.9 53.1,41.9 55.6,41.9 58.4,44.7 58.4,53.1 62.4,57.1 62.4,57.5 62.6,57.7 62.6,66.1 63.3,66.8 63.3,70.7 65.6,73 65.6,76.7 v1(64.2,78.1) ; v2(52.2,97.8) U7.31@52.2,99.1 ; U11.19@72.1,87.7 72.1,88.2 72.6,88.7 72.6,89.2 v1(72.9,89.5)
  Top Layer w0.2: U3.A3@63.7,78.625 v1(64.2,78.1)
  MidLayer2 w0.127: v1(68.3,82.3) 68.8,82.3 71.8,85.3 71.8,87.3 72.9,88.4 v1(72.9,89.5)
  MidLayer3 w0.127: v2(52.2,97.8) 52.2,97 52.846,96.354 53.946,96.354 60.2,90.1 60.6,89.7 60.6,89.288 60.588,89.288 60.4,89.1 60.4,88.4 61.7,87.1 v1(61.7,85.8)
  MidLayer4 w0.127: v2(36.2,100.3) 36.2,98.7 35.7,98.2 35.7,97.6 36,97.3 36,97.1 37.9,95.2 50.2,95.2 52.2,97.2 v2(52.2,97.8) ; v1(61.7,85.8) 62.2,85.3 63.8,85.3 65.9,87.4 71.4,87.4 72.6,88.6 72.6,89.2 v1(72.9,89.5)
  Bottom Layer w0.127: U8.31@36.2,99.1 v2(36.2,100.3) ; v1(61.7,85.8) U12.19@61.7,87.7 ; v1(64.2,78.1) 64.2,78.6 67.9,82.3 v1(68.3,82.3)
BUS_A9: U3.B6 U4.L23 U7.32 U8.32 U11.20 U12.20 | length 132.2
  Top Layer w0.127: v2(51.4,97.2) U7.32@51.4,99.1 ; U11.20@72.9,87.7 72.9,88.8 73.7,89.6 v1(73.7,90.5)
  Top Layer w0.2: U4.L23@48.2,39.9 v1(48.7,40.4) ; U3.B6@62.7,75.625 v1@63.2,75.125
  MidLayer1 w0.127: v1(48.7,40.4) 49.2,40.9 50.1,40.9 50.4,41.2 52.8,41.2 53.1,41.2 53.4,41.2 54.1,41.9 55.9,41.9 58.4,44.4 58.4,53.3 62.409,57.309 62.409,57.49 62.4,57.5 62.7,57.8 62.7,59 64,60.3 64,69.4 ; v1@63.2,75.125 63.7,74.625 63.7,74.6 63.7,73.4 63.999,73.1 64,68.8
  MidLayer3 w0.127: v2(51.4,97.2) 52.5,96.1 53.4,96.1 53.9,95.6 59.6,89.9 59.6,89.3 60.1,88.8 60.1,87.2 v2(60.9,86.4) ; v1(72.4,81.9) 72.4,85.4 73.2,86.2 73.2,89.1 73.7,89.6 ; 73.7,89.6 v1(73.7,90.5)
  MidLayer4 w0.127: v2(37,100.3) 37,97.9 36.5,97.4 36.5,97 38,95.5 49.7,95.5 v2(51.4,97.2) ; v2(60.9,86.4) 60.9,85.3 61.7,84.5 73.1,84.5 73.8,85.2 73.8,85.8 73.5,86.1 73.5,88 74.2,88.7 74.2,89.1 74,89.3 74,90.2 v1(73.7,90.5)
  Bottom Layer w0.127: U8.32@37,99.1 v2(37,100.3) ; v2(60.9,86.4) U12.20@60.9,87.7 ; v1(63.2,75.1) 63.7,75.6 64.9,75.6 65.3,76 65.3,78.141 69.059,81.9 v1(72.4,81.9)
BUS_A10: U3.A6 U4.H25 U7.33 U8.33 U11.21 U12.21 | length 120.9
  Top Layer w0.127: U4.H25@50.2,42.9 50.7,43.4 52.8,43.4 53.1,43.4 55.6,43.4 57.5,45.3 57.5,54 60.2,56.7 60.2,57.5 60,57.7 60,58.2 61.7,59.9 61.7,66.4 62.4,67.1 62.4,69.904 ; v2(50.6,97.8) U7.33@50.6,99.1 ; 62.4,69.6 62.4,71 64.7,73.3 64.7,74.6 v1(64.2,75.1) v1@64.2,75.125 ; U11.21@73.7,87.7 v1(73.7,88.9)
  Top Layer w0.2: U3.A6@63.7,75.625 v1@64.2,75.125
  MidLayer2 w0.127: v1(72.9,82.9) 72.9,84.3 73.7,85.1 73.7,85.9 73.5,86.1 73.5,88.1 73.7,88.3 v1(73.7,88.9)
  MidLayer3 w0.127: v2(50.6,97.8) 50.6,96.8 51.6,95.8 53.3,95.8 59,90.1 59,89.3 58.8,89.1 58.8,87.6 60.1,86.3 v1(60.1,85.8)
  MidLayer4 w0.127: v2(37.8,97.8) 37.8,96.9 38.9,95.8 49.2,95.8 50.6,97.2 v2(50.6,97.8) ; v1(60.1,85.8) 60.1,88.8 60.588,89.288 60.6,89.288 60.6,89.919 61.881,91.2 72.7,91.2 73.1,90.8 73.1,90.4 73.7,89.8 v1(73.7,88.9)
  Bottom Layer w0.127: v2(37.8,97.8) U8.33@37.8,99.1 ; v1(60.1,85.8) U12.21@60.1,87.7 ; v1(64.2,75.1) 65.1,75.1 66,76 66,78.481 68.918,81.4 72.6,81.4 72.9,81.7 v1(72.9,82.9)
BUS_A11: U3.C6 U4.K24 U7.34 U8.34 U11.22 U12.22 | length 127.8
  Top Layer w0.127: v2(49.8,97.2) U7.34@49.8,99.1 ; U11.22@74.5,87.7 74.5,89.4 v1(74.8,89.7)
  Top Layer w0.2: U4.K24@49.2,40.9 v1(49.7,41.4) ; U3.C6@61.7,75.625 v1@62.2,75.125
  MidLayer1 w0.127: v1(49.7,41.4) 50.1,41.4 50.3,41.6 52.8,41.6 53.1,41.6 53.4,41.6 54,42.2 55.8,42.2 58.1,44.5 58.1,53.4 61.8,57.1 61.8,57.5 61.5,57.8 61.5,58.4 63.7,60.6 63.7,72.9 62.7,73.9 62.7,74.625 v1@62.2,75.125
  MidLayer2 w0.127: v1(74.6,82.8) 74.6,84.8 75.1,85.3 75.1,85.9 74.8,86.2 v1(74.8,89.7)
  MidLayer3 w0.127: v2(49.8,97.2) 51.5,95.5 53.2,95.5 57.9,90.8 57.9,89.4 58.2,89.1 58.2,87.5 v2(59.3,86.4)
  MidLayer4 w0.127: v2(38.6,100.3) 38.6,97.9 38.1,97.4 38.1,97 39,96.1 48.7,96.1 v2(49.8,97.2) ; v2(59.3,86.4) 59.3,88.2 59.8,88.7 59.8,89.1 59.6,89.3 59.6,89.7 61.7,91.8 73.6,91.8 74.8,90.6 v1(74.8,89.7) ; v1(62.2,75.1) 62.7,75.6 67.3,75.6 72.7,81 74,81 74.6,81.6 v1(74.6,82.8)
  Bottom Layer w0.127: U8.34@38.6,99.1 v2(38.6,100.3) ; v2(59.3,86.4) U12.22@59.3,87.7
BUS_A12: U3.D6 U4.K23 U7.22 U8.22 U11.23 U12.23 | length 139.2
  Top Layer w0.127: U7.22@50.6,87.7 v2(50.6,89.6) ; v2(74.5,97.8) U11.23@74.5,99.1
  Top Layer w0.2: U4.K23@48.2,40.9 v1(48.7,41.4) ; U3.D6@60.7,75.625 v1@61.2,75.125
  MidLayer1 w0.127: v1(48.7,41.4) 49.2,41.9 52.8,41.9 53.1,41.9 53.3,41.9 53.9,42.5 55.7,42.5 57.8,44.6 57.8,53.5 60.8,56.5 60.8,57.5 61.1,57.8 61.1,58.5 61.4,58.8 61.8,59.201 62.2,59.6 62.2,73.4 61.7,73.9 61.7,74.6 v1(61.2,75.1) 61.2,75.125 v1@61.213,75.113
  MidLayer2 w0.127: v2(50.6,89.6) 51.4,90.4 54.4,90.4 58.8,94.8 58.8,97.4 59.1,97.7 v2(59.1,100.4) ; v2(74.5,97.8) 74.5,91.7 77.3,88.9 77.3,82.3 v1(75.9,80.9)
  MidLayer4 w0.127: v2(37.8,89) 37.8,89.9 38.9,91 49.2,91 v2(50.6,89.6) ; v2(59.1,100.4) 59.1,99.9 59.3,99.7 59.3,97.9 59.8,97.4 59.8,96.8 60.2,96.4 74,96.4 74.5,96.9 v2(74.5,97.8) ; v1(61.2,75.1) 61.7,74.6 69.6,74.6 70.974,75.974 74.074,75.974 75.9,77.8 v1(75.9,80.9)
  Bottom Layer w0.127: U8.22@37.8,87.7 v2(37.8,89) ; v2(59.1,100.4) 59.1,99.8 59.3,99.6 U12.23@59.3,99.1
BUS_A13: U3.B7 U4.G25 U7.35 U8.35 U11.24 U12.24 | length 127.6
  Top Layer w0.127: v2(49,97.8) U7.35@49,99.1 ; U4.G25@50.2,43.9 50.7,44.4 51.6,44.4 52.1,44.9 52.8,44.9 53.1,44.9 53.7,44.9 53.987,44.612 55.812,44.612 56.9,45.7 56.9,54.4 58.6,56.1 58.6,57.5 58.4,57.7 58.4,58.187 61.1,60.887 61.1,66.6 61.8,67.3 61.8,71.3 63.2,72.7 63.2,74.125 U3.B7@62.7,74.625 ; v2(73.7,97.2) U11.24@73.7,99.1
  MidLayer1 w0.127: v2(49,97.8) 49,99.4 51.1,101.5 59,101.5 v2(60.1,100.4)
  MidLayer2 w0.127: v2(73.7,97.2) 74,96.9 74,91.6 77,88.6 77,82.8 v1(75.1,80.9)
  MidLayer4 w0.127: v2(39.4,100.3) 39.4,98.6 38.9,98.1 38.9,97.6 40.1,96.4 48.2,96.4 49,97.2 v2(49,97.8) ; v2(60.1,100.4) 61.5,101.8 72,101.8 72.6,101.2 72.6,100.8 72.4,100.6 72.4,99.2 73.4,98.2 73.4,97.5 v2(73.7,97.2)
  Bottom Layer w0.127: U8.35@39.4,98.6 39.4,99.1 v2(39.4,100.3) ; U12.24@60.1,99.1 v2(60.1,100.4) ; v1(63.2,74.1) 63.7,73.6 65,73.6 66.713,75.313 66.713,78.476 69.129,80.892 75.092,80.892 v1(75.1,80.9)
BUS_A14: U3.A7 U4.G26 U7.36 U8.36 U11.25 U12.25 | length 117.5
  Top Layer w0.127: v2(48.2,97.2) U7.36@48.2,99.1 ; U4.G26@51.2,43.9 52.8,43.9 53.1,43.9 55.6,43.9 57.2,45.5 57.2,54.2 59.2,56.2 59.2,57.5 59.4,57.7 59.4,58.4 61.4,60.4 61.4,66.5 62.1,67.2 62.1,71.1 64.2,73.2 v1@64.2,74.125 ; v2(72.9,97.8) U11.25@72.9,99.1
  Top Layer w0.2: U3.A7@63.7,74.625 v1@64.2,74.125
  MidLayer1 w0.127: v2(48.2,97.2) 48.2,99.6 48.7,100.1 48.7,100.5 48.5,100.7 48.5,101.1 48.8,101.4 50.5,101.4 50.9,101.8 59.5,101.8 v2(60.9,100.4)
  MidLayer3 w0.127: v2(72.9,97.8) 73.2,97.5 73.2,96.9 74.2,95.9 74.2,90.3 74,90.1 74,89.3 74.2,89.1 74.2,87.5 73.5,86.8 73.5,86.1 73.7,85.9 73.7,85.2 73.4,84.9 v1(73.4,81.9)
  MidLayer4 w0.127: v2(40.2,97.3) 40.8,96.7 47.7,96.7 v2(48.2,97.2) ; v2(60.9,100.4) 62,101.5 70.9,101.5 72.1,100.3 72.1,98.6 v2(72.9,97.8)
  Bottom Layer w0.127: v2(40.2,97.3) U8.36@40.2,99.1 ; U12.25@60.9,99.1 v2(60.9,100.4) ; v1(64.2,74.1) 64.8,74.1 66.459,75.759 66.459,78.581 69.024,81.146 73.046,81.146 73.4,81.5 v1(73.4,81.9)
BUS_A15: U3.C7 U4.E26 U7.20 U8.20 U11.26 U12.26 | length 118.1
  Top Layer w0.127: U7.20@49,87.7 v2(49,89.6) ; U4.E26@51.2,45.9 51.3,45.8 52.8,45.8 53.1,45.8 54.1,45.8 56.3,48 56.3,56.1 57,56.8 57,57.5 56.8,57.7 56.8,58.2 59.9,61.3 59.9,67.8 60.2,68.1 60.2,71 62.2,73 v1(62.2,74.1) 62.2,74.125 U3.C7@61.7,74.625 ; v2(72.1,97.2) U11.26@72.1,99.1
  MidLayer2 w0.127: v2(49,89.6) 50.1,90.7 54.1,90.7 58.2,94.8 58.2,97.4 58,97.6 58,98.6 58.25,98.85 58.6,99.2 58.6,100.6 58.9,100.9 61.2,100.9 v2(61.7,100.4) ; v1(68.1,83) 68.5,83 71.4,85.9 71.4,87.4 72.6,88.6 72.6,89.1 72.4,89.3 72.4,89.7 72.8,90.1 72.8,90.8 72.3,91.3 72.3,93.3 72,93.6 72,94.1 72.1,94.2 v2(72.1,97.2)
  MidLayer3 w0.127: v1(62.2,74.1) 62.7,74.6 64.4,74.6 67.7,77.9 67.7,82.4 67.8,82.5 67.8,82.7 v1(68.1,83)
  MidLayer4 w0.127: v2(39.4,86.5) 39.4,88.3 38.9,88.8 38.9,89.2 39.2,89.5 39.2,89.8 39.8,90.4 48.2,90.4 v2(49,89.6) ; v2(61.7,100.4) 61.7,99.8 62.8,98.7 69.7,98.7 71.2,97.2 v2(72.1,97.2)
  Bottom Layer w0.127: v2(39.4,86.5) U8.20@39.4,87.7 ; U12.26@61.7,99.1 v2(61.7,100.4)
BUS_A16: U3.D7 U4.D25 U7.21 U8.21 U11.27 U12.27 | length 122.5
  Top Layer w0.127: U7.21@49.8,87.7 v2(49.8,89) ; U4.D25@50.2,46.9 50.7,47.4 52.8,47.4 53.1,47.4 53.9,47.4 55,48.5 55,56.4 54.4,57 54.4,57.5 54.7,57.8 54.7,58.5 58.6,62.4 58.6,72.6 59.2,73.2 59.2,74.8 59.525,75.125 v1@60.2,75.125 ; v2(71.3,97.8) U11.27@71.3,99.1
  Top Layer w0.2: v1@60.2,75.125 60.213,75.113 U3.D7@60.7,74.625
  MidLayer2 w0.127: v2(49.8,89) 48.9,89 48.5,89.4 48.5,89.8 48.9,90.2 49.7,91 53.8,91 57.2,94.4 57.2,98.5 58.2,99.5 58.2,100.6 58.8,101.2 61.8,101.2 62.5,100.5 v2(62.5,100.4) ; v1(67.3,83.7) 70,86.4 70,89.1 70.2,89.3 70.2,89.7 69.9,90 69.9,90.5 71.2,91.8 71.2,93.4 71.4,93.6 71.4,94.1 71.3,94.2 v2(71.3,97.8)
  MidLayer4 w0.127: v2(38.6,86.5) 38.6,88.9 38.1,89.4 38.1,89.8 39,90.7 48.6,90.7 49.8,89.5 v2(49.8,89) ; v1(60.2,75.1) 60.2,76.1 59.7,76.6 59.7,77.3 60,77.6 60.4,77.6 60.7,77.9 60.7,78.3 61,78.6 64.1,78.6 66.8,81.3 66.8,83.2 v1(67.3,83.7) ; v2(62.5,100.4) 62.5,99.8 62.8,99.5 70.7,99.5 71.3,98.9 v2(71.3,97.8)
  Bottom Layer w0.127: v2(38.6,86.5) U8.21@38.6,87.7 ; U12.27@62.5,99.1 v2(62.5,100.4)
BUS_A17: U3.E7 U4.D26 U11.42 U12.42 | length 100.7
  Top Layer w0.127: U4.D26@51.2,46.9 51.7,46.9 52.2,46.4 52.8,46.4 53.1,46.4 53.7,46.4 55.7,48.4 55.7,57.2 55.2,57.7 55.2,58.1 58.9,61.8 58.9,71.3 60.2,72.6 v1(60.2,74.1) ; v2(59.3,97.2) U11.42@59.3,99.1
  Top Layer w0.2: U3.E7@59.7,74.625 v1(60.2,74.1)
  MidLayer3 w0.127: v2(74.5,100.4) 74.5,98.5 75.3,97.7 75.3,97.2 75,96.9 75,90.8 75.3,90.5 75.3,87.1 74.9,86.7 74.9,86.1 75.1,85.9 v1(75.1,84.1)
  MidLayer4 w0.127: v2(59.3,97.2) 59.3,96.7 59.9,96.1 74.1,96.1 75,97 75,98.7 74.5,99.2 v2(74.5,100.4) ; v1(60.2,74.1) 60.7,73.6 73.4,73.6 76.4,76.6 76.4,82.8 v1(75.1,84.1)
  Bottom Layer w0.127: U12.42@74.5,99.1 v2(74.5,100.4)
BUS_A18: U3.B3 U4.K22 U11.43 U12.43 | length 104.9
  Top Layer w0.127: v2(58.5,97.8) U11.43@58.5,99.1 ; v1(63.2,78.1) v1@63.2,78.125
  Top Layer w0.2: U4.K22@47.2,40.9 v1(47.7,41.4) ; U3.B3@62.7,78.625 v1@63.2,78.125
  MidLayer2 w0.127: v1(47.7,41.4) 48.2,41.9 50.8,41.9 51.4,42.5 52.8,42.5 53.1,42.5 54.8,42.5 58.6,46.3 60.1,47.8 60.1,54.4 61.9,56.2 61.9,57.4 61.5,57.8 61.5,58.3 62.1,58.9 62.1,67.9 62.1,72.2 62.2,72.3 62.2,73.3 62.7,73.8 62.7,75.6 62.7,77.6 v1(63.2,78.1)
  MidLayer3 w0.127: v2(75.3,100.4) 75.3,98.2 75.6,97.9 75.6,97 75.3,96.7 75.3,91 75.6,90.7 75.6,87 75.9,86.7 75.9,86.2 75.6,85.9 v1(75.6,84.7)
  MidLayer4 w0.127: v2(58.5,97.8) 58.5,97.1 59.8,95.8 74.2,95.8 75.3,96.9 v2(75.3,100.4)
  Bottom Layer w0.127: v1(63.2,78.1) 63.7,77.6 64.4,77.6 70.85,84.05 73.35,84.05 74,84.7 v1(75.6,84.7) ; U12.43@75.3,99.1 v2(75.3,100.4)
BUS_A19: U3.C4 U4.H22 U11.44 U12.44 | length 109.5
  Top Layer w0.127: v2(57.7,97.2) U11.44@57.7,99.1
  Top Layer w0.2: U4.H22@47.2,42.9 v1(47.7,43.4) ; v1(61.2,77.1) U3.C4@61.7,77.625
  MidLayer2 w0.127: v1(47.7,43.4) 48.2,43.9 52.8,43.9 53.1,43.9 55.3,43.9 59.5,48.1 59.5,54.875 60.2,55.575 60.2,57.5 59.9,57.8 59.9,58.2 59.5,58.6 59.5,67.7 59.2,68 59.2,71.5 60.7,73 60.7,76.6 v1(61.2,77.1)
  MidLayer3 w0.127: v2(76.1,100.4) 76.1,99.7 75.9,99.5 75.9,96.7 75.6,96.4 75.6,91.2 75.9,90.9 75.9,87.7 76.1,87.5 v1(77.8,85.8)
  MidLayer4 w0.127: v2(57.7,97.2) 59.4,95.5 74.337,95.5 76.1,97.262 v2(76.1,100.4) ; v1(61.2,77.1) 61.7,76.6 67.8,76.6 72.5,81.3 73.7,81.3 74,81.6 74,82.9 74.5,83.4 74.5,84.3 75.4,85.2 77.1,85.2 77.7,85.8 v1(77.8,85.8)
  Bottom Layer w0.127: U12.44@76.1,99.1 v2(76.1,100.4)
BUS_A20: U3.D5 U4.J23 U11.28 U12.28 | length 87
  Top Layer w0.127: v2(70.5,97.2) U11.28@70.5,99.1
  Top Layer w0.2: U4.J23@48.2,41.9 v1(48.7,42.4) ; U3.D5@60.7,76.625 v1(61.2,76.1)
  MidLayer1 w0.127: v1(48.7,42.4) 49.2,42.9 52.8,42.9 53.1,42.9 55.7,42.9 57.4,44.6 57.4,54.3 60.2,57.1 60.2,57.5 59.9,57.8 59.9,58.1 61.9,60.1 61.9,71.3 60.7,72.5 60.7,75.6 v1(61.2,76.1)
  MidLayer2 w0.127: v2(63.3,100.4) 63.8,100.9 69.1,100.9 69.7,100.3 69.7,98.9 70.5,98.1 70.5,94.2 70.4,94.1 70.4,93.6 70.7,93.3 70.7,92 69.4,90.7 69.4,89.9 69.2,89.7 69.2,89.3 69.4,89.1 69.4,86.7 66.8,84.1 66.8,83.2 v1(67.3,82.7)
  MidLayer4 w0.127: v1(61.2,76.1) 60.7,76.6 60.7,77.3 61,77.6 64.4,77.6 67.3,80.5 v1(67.3,82.7)
  Bottom Layer w0.127: U12.28@63.3,99.1 v2(63.3,100.4)
BUS_A21: U3.D4 U4.J22 | length 47.1
  Top Layer w0.2: U4.J22@47.2,41.9 v1(47.7,42.4) ; U3.D4@60.7,77.625 v1(61.2,78.1)
  MidLayer2 w0.127: v1(47.7,42.4) 48.2,42.9 52.8,42.9 53.1,42.9 54.8,42.9 59.8,47.9 59.8,54.625 60.5,55.325 60.5,57.2 61.1,57.8 61.1,58.4 61.8,59.1 61.8,69.825 61.8,72.5 61.9,72.6 61.9,73.1 61.7,73.3 61.7,73.9 61.7,77.6 v1(61.2,78.1)
BUS_A22: U3.C5 U4.L24 | length 61.5
  Top Layer w0.2: U4.L24@49.2,39.9 v1(49.7,40.4) ; U3.C5@61.7,76.625 v1@62.2,76.125
  MidLayer1 w0.127: v1(49.7,40.4) 50,40.4 50.5,40.9 52.8,40.9 53.1,40.9 55.3,40.9 58.7,44.3 58.7,53.2 62.3,56.8 63.2,56.8 63.4,57 63.4,57.5 63.1,57.8 63.1,58.9 64.3,60.1 64.3,69.7 64.7,70.1 64.7,75.4 64.5,75.6 63.7,75.6 63.175,76.125 v1@62.2,76.125
  Bottom Layer w0.127: v1(51.2,77) 52.6,77 52.8,76.8 55.2,76.8 56,77.6 56.4,77.6 56.7,77.3 56.7,76.8 56.9,76.6 61.7,76.6 62.175,76.125 v1@62.2,76.125
  other v1: 62.2,76.1
BUS_A23: U3.B8 U4.F26 | length 50.8
  Top Layer w0.127: U4.F26@51.2,44.9 51.7,44.9 52,45.2 52.8,45.2 53.1,45.2 53.8,45.2 54.1,44.9 55.7,44.9 56.6,45.8 56.6,54.6 57.6,55.6 57.6,57.5 57.8,57.7 57.8,58.4 60.8,61.4 60.8,67.3 61,67.5 61,67.9 60.8,68.1 60.8,71 v1(62.7,72.9) U3.B8@62.7,73.625
  Bottom Layer w0.127: v1(51.8,76.5) 55.725,76.5 55.825,76.6 56.5,76.6 56.7,76.4 56.7,75.8 56.9,75.6 62.5,75.6 62.7,75.4 v1(62.7,72.9)
BUS_A24: U3.C8 U4.E25 | length 49.2
  Top Layer w0.127: U4.E25@50.2,45.9 50.7,46.4 51.225,46.4 51.487,46.4 51.788,46.1 52.8,46.1 53.1,46.1 53.9,46.1 56,48.2 56,57.5 56.2,57.7 56.2,58.4 59.2,61.4 59.2,70.7 v1(61.4,72.9) 61.7,73.2 U3.C8@61.7,73.625
  Bottom Layer w0.127: v1(50.6,76.5) 53.6,73.6 58.5,73.6 59.5,74.6 61.5,74.6 61.7,74.4 61.7,73.2 v1(61.4,72.9)
BUS_D0: U3.E3 U4.E20 U7.2 U11.7 | length 100.8
  Top Layer w0.127: U7.2@34.6,87.7 v2(34.6,89) ; U11.7@62.5,87.7 v1(62.5,88.9) 62.5,89.4 64.1,91 64.7,91 v2(66.9,93.2)
  Top Layer w0.2: U4.E20@45.2,45.9 v1(45.7,46.4) ; v1(59.2,79.1) U3.E3@59.7,78.625
  MidLayer1 w0.127: v2(34.6,89) 34.6,89.5 37.6,92.5 56.8,92.5 57,92.7 66.4,92.7 v2(66.9,93.2) ; v1(59.2,79.1) 57.7,80.6 57.7,83.4 59.2,84.9 62.3,84.9 62.8,85.4 62.8,86 63,86.2 63,86.6 62.5,87.1 v1(62.5,88.9)
  MidLayer2 w0.127: v1(45.7,46.4) 46.2,46.9 46.2,51.5 46.2,51.8 46.2,53.1 48.8,55.7 51.4,55.7 51.7,56 52.6,56 52.8,56.2 52.8,57.5 53.1,57.8 53.1,67.7 52.8,68 52.8,68.5 53.2,68.9 ; 52.95,68.65 57.7,73.4 57.7,78.4 57.9,78.6 58.475,78.6 58.975,79.1 v1(59.2,79.1)
BUS_D1: U3.H3 U4.B20 U7.4 U11.8 | length 95.1
  Top Layer w0.127: U7.4@36.2,87.7 v2(36.2,89) ; U4.B20@45.2,48.9 45.7,49.4 45.7,50.3 46.2,50.8 46.2,51.5 46.2,51.8 46.2,54.9 47.5,56.2 47.5,57.4 47.2,57.7 47.2,58.1 52.8,63.7 52.8,68.5 54.3,70 54.3,74.918 55,75.618 55,77.9 v1(56.2,79.1) ; U11.8@63.3,87.7 v1(63.3,89.5) 64.4,90.6 65.1,90.6 67.7,93.2 v2(67.7,93.8)
  Top Layer w0.2: v1(56.2,79.1) U3.H3@56.7,78.625
  MidLayer1 w0.127: v2(36.2,89) 36.2,89.5 38.9,92.2 57,92.2 57.2,92.4 66.8,92.4 67.7,93.3 v2(67.7,93.8) ; v1(56.2,79.1) 56.7,79.6 56.7,82.9 59.1,85.3 61.9,85.3 62.2,85.6 62.2,86 62,86.2 62,89.1 62.4,89.5 v1(63.3,89.5)
BUS_D2: U3.E4 U4.E22 U7.5 U11.9 | length 97.6
  Top Layer w0.127: U7.5@37,87.7 v2(37,89.6) ; U11.9@64.1,87.7 64.1,89.4 64.7,90 65.3,90 v2(68.5,93.2)
  Top Layer w0.2: U4.E22@47.2,45.9 v1(47.7,46.4) ; U3.E4@59.7,77.625 v1(60.2,78.1)
  MidLayer1 w0.127: v2(37,89.6) 39.3,91.9 57.2,91.9 57.4,92.1 67.4,92.1 v2(68.5,93.2) ; v1(60.2,78.1) 59.7,78.6 59.7,81.5 60.1,81.9 62.4,81.9 63.8,83.3 63.8,85.3 64.7,86.2 64.7,88.3 v1(64.1,88.9)
  MidLayer2 w0.127: v1(47.7,46.4) 48.2,46.9 48.2,51.5 48.2,51.8 48.2,52.1 49.5,53.4 51,53.4 51.8,54.2 52.4,54.2 54.4,56.2 54.4,57.5 54.6,57.7 54.6,67.9 54.3,68.2 54.3,68.8 57.6,72.1 58.7,72.1 58.9,72.3 59.2,72.6 59.2,73.7 59.7,74.2 59.7,77.6 v1(60.2,78.1)